# Altium PCB PCB1.PcbDoc (part 2 of 2)
Units mil, origin at the board's own origin, x right, y up, seen from the top; angles counter-clockwise.
Board outline 6000 x 4000 mil, 2 copper layers (Top Layer, Bottom Layer); 140 components, 124 nets, 525 pads, 86 vias.
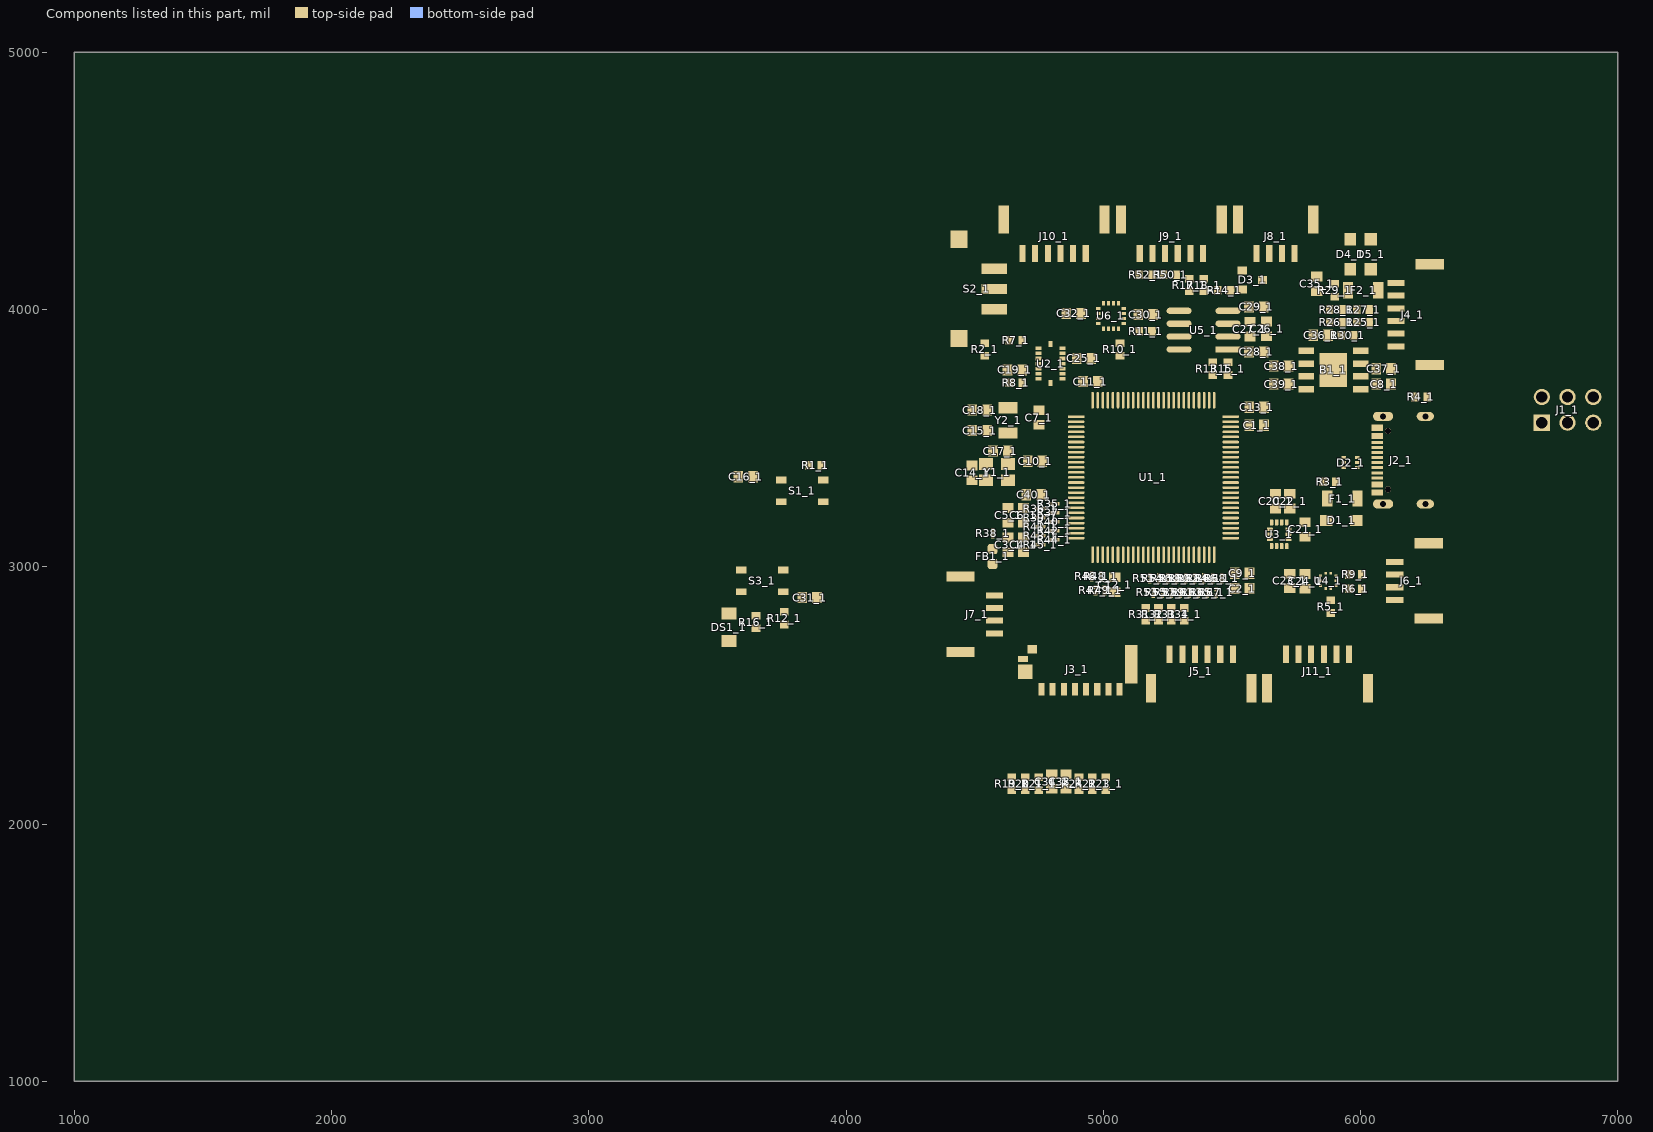
[diagram p2: the components of this part, seen from the top]

## Via types
v1: diameter 17.72, hole 11.81, Top Layer to Bottom Layer, 57 vias
v2: diameter 23.62, hole 11.81, Top Layer to Bottom Layer, 28 vias
v3: diameter 17.72/17.72 (per signal layer), hole 11.81, Top Layer to Bottom Layer, 1 vias

## Nets (pads, with @x,y where several pads share a name; then routed paths per layer and width w, separated by ;. In a path a pad name is that pad's centre, name@x,y a point inside that pad or via, vN(x,y) a via of type N, cw(c..) or ccw(c..) an arc to the next point about the centre after c; other vN are vias at no path point) (continued)
pads on no net: B1_1.1 B1_1.2 B1_1.3 B1_1.4 B1_1.5 B1_1.6 B1_1.7 B1_1.8 B1_1.9 C1_1.1 C1_1.2 C2_1.1 C2_1.2 C3_1.1 C3_1.2 C4_1.1 C4_1.2 C5_1.1 C5_1.2 C6_1.1 C6_1.2 C7_1.1 C7_1.2 C8_1.1 C8_1.2 C9_1.1 C9_1.2 C10_1.1 C10_1.2 C11_1.1 C11_1.2 C12_1.1 C12_1.2 C13_1.1 C13_1.2 C14_1.1 C14_1.2 C15_1.1 C15_1.2 C16_1.1 C16_1.2 C17_1.1 C17_1.2 C18_1.1 C18_1.2 C19_1.1 C19_1.2 C20_1.1 C20_1.2 C21_1.1 C21_1.2 C22_1.1 C22_1.2 C23_1.1 C23_1.2 C24_1.1 C24_1.2 C25_1.1 C25_1.2 C26_1.1 C26_1.2 C27_1.1 C27_1.2 C28_1.1 C28_1.2 C29_1.1 C29_1.2 C30_1.1 C30_1.2 C31_1.1 C31_1.2 C32_1.1 C32_1.2 C33_1.1 C33_1.2 C34_1.1 C34_1.2 C35_1.1 C35_1.2 C36_1.1 C36_1.2 C37_1.1 C37_1.2 C38_1.1 C38_1.2 C39_1.1 C39_1.2 C40_1.1 C40_1.2 D1_1.A D1_1.K D2_1.1 D2_1.2 D2_1.3 D2_1.4 D2_1.5 D2_1.6 D3_1.1 D3_1.2 D3_1.3 D4_1.A D4_1.K D5_1.1 D5_1.2 DS1_1.1 DS1_1.2 F1_1.1 F1_1.2 F2_1.1 F2_1.2 FB1_1.1 FB1_1.2 J1_1.1 J1_1.2 J1_1.3 J1_1.4 J1_1.5 J1_1.6 J2_1. J2_1.A1_B12 J2_1.A4_B9 J2_1.A5 J2_1.A6 J2_1.A7 J2_1.A8 J2_1.B1_A12 J2_1.B4_A9 J2_1.B5 J2_1.B6 J2_1.B7 J2_1.B8 J2_1.S1 J2_1.S2 J2_1.S3 J2_1.S4 J3_1.1 J3_1.2 J3_1.3 J3_1.4 J3_1.5 J3_1.6 J3_1.7 J3_1.8 J3_1.DET_1 J3_1.DET_2 J3_1.S1 J3_1.S2 J4_1.1 J4_1.2 J4_1.3 J4_1.4 J4_1.5 J4_1.6 J4_1.S1 J4_1.S2 J5_1.1 J5_1.2 J5_1.3 J5_1.4 J5_1.5 J5_1.6 J5_1.S1 J5_1.S2 J6_1.1 J6_1.2 J6_1.3 J6_1.4 J6_1.S1 J6_1.S2 J7_1.1 J7_1.2 J7_1.3 J7_1.4 J7_1.S1 J7_1.S2 J8_1.1 J8_1.2 J8_1.3 J8_1.4 J8_1.S1 J8_1.S2 J9_1.1 J9_1.2 J9_1.3 J9_1.4 J9_1.5 J9_1.6 J9_1.S1 J9_1.S2 J10_1.1 J10_1.2 J10_1.3 J10_1.4 J10_1.5 J10_1.6 J10_1.S1 J10_1.S2 J11_1.1 J11_1.2 J11_1.3 J11_1.4 J11_1.5 J11_1.6 J11_1.S1 J11_1.S2 R1_1.1 R1_1.2 R2_1.1 R2_1.2 R3_1.1 R3_1.2 R4_1.1 R4_1.2 R5_1.1 R5_1.2 R6_1.1 R6_1.2 R7_1.1 R7_1.2 R8_1.1 R8_1.2 R9_1.1 R9_1.2 R10_1.1 R10_1.2 R11_1.1 R11_1.2 R12_1.1 R12_1.2 R13_1.1 R13_1.2 R14_1.1 R14_1.2 R15_1.1 R15_1.2 R16_1.1 R16_1.2 R17_1.1 R17_1.2 R18_1.1 R18_1.2 R19_1.1 R19_1.2 R20_1.1 R20_1.2 R21_1.1 R21_1.2 R22_1.1 R22_1.2 R23_1.1 R23_1.2 R24_1.1 R24_1.2 R25_1.1 R25_1.2 R26_1.1 R26_1.2 R27_1.1 R27_1.2 R28_1.1 R28_1.2 R29_1.1 R29_1.2 R30_1.1 R30_1.2 R31_1.1 R31_1.2 R32_1.1 R32_1.2 R33_1.1 R33_1.2 R34_1.1 R34_1.2 R35_1.1 R35_1.2 R36_1.1 R36_1.2 R37_1.1 R37_1.2 R38_1.1 R38_1.2 R39_1.1 R39_1.2 R40_1.1 R40_1.2 R41_1.1 R41_1.2 R42_1.1 R42_1.2 R43_1.1 R43_1.2 R44_1.1 R44_1.2 R45_1.1 R45_1.2 R46_1.1 R46_1.2 R47_1.1 R47_1.2 R48_1.1 R48_1.2 R49_1.1 R49_1.2 R50_1.1 R50_1.2 R51_1.1 R51_1.2 R52_1.1 R52_1.2 R53_1.1 R53_1.2 R54_1.1 R54_1.2 R55_1.1 R55_1.2 R56_1.1 R56_1.2 R57_1.1 R57_1.2 R58_1.1 R58_1.2 R59_1.1 R59_1.2 R60_1.1 R60_1.2 R61_1.1 R61_1.2 R62_1.1 R62_1.2 R63_1.1 R63_1.2 R64_1.1 R64_1.2 R65_1.1 R65_1.2 R66_1.1 R66_1.2 R67_1.1 R67_1.2 R68_1.1 R68_1.2 S1_1.1 S1_1.2 S1_1.3 S1_1.4 S2_1.1 S2_1.2 S2_1.3 S2_1.M S3_1.1 S3_1.2 S3_1.3 S3_1.4 U1_1.1 U1_1.2 U1_1.3 U1_1.4 U1_1.5 U1_1.6 U1_1.7 U1_1.8 U1_1.9 U1_1.10 U1_1.11 U1_1.12 U1_1.13 U1_1.14 U1_1.15 U1_1.16 U1_1.17 U1_1.18 U1_1.19 U1_1.20 U1_1.21 U1_1.22 U1_1.23 U1_1.24 U1_1.25 U1_1.26 U1_1.27 U1_1.28 U1_1.29 U1_1.30 U1_1.31 U1_1.32 U1_1.33 U1_1.34 U1_1.35 U1_1.36 U1_1.37 U1_1.38 U1_1.39 U1_1.40 U1_1.41 U1_1.42 U1_1.43 U1_1.44 U1_1.45 U1_1.46 U1_1.47 U1_1.48 U1_1.49 U1_1.50 U1_1.51 U1_1.52 U1_1.53 U1_1.54 U1_1.55 U1_1.56 U1_1.57 U1_1.58 U1_1.59 U1_1.60 U1_1.61 U1_1.62 U1_1.63 U1_1.64 U1_1.65 U1_1.66 U1_1.67 U1_1.68 U1_1.69 U1_1.70 U1_1.71 U1_1.72 U1_1.73 U1_1.74 U1_1.75 U1_1.76 U1_1.77 U1_1.78 U1_1.79 U1_1.80 U1_1.81 U1_1.82 U1_1.83 U1_1.84 U1_1.85 U1_1.86 U1_1.87 U1_1.88 U1_1.89 U1_1.90 U1_1.91 U1_1.92 U1_1.93 U1_1.94 U1_1.95 U1_1.96 U1_1.97 U1_1.98 U1_1.99 U1_1.100 U2_1.1 U2_1.2 U2_1.3 U2_1.4 U2_1.5 U2_1.6 U2_1.7 U2_1.8 U2_1.9 U2_1.10 U2_1.11 U2_1.12 U2_1.13 U2_1.14 U2_1.15 U2_1.16 U3_1.1 U3_1.2 U3_1.3 U3_1.4 U3_1.5 U3_1.6 U3_1.7 U3_1.8 U3_1.9 U3_1.10 U3_1.11 U3_1.12 U3_1.13 U3_1.14 U4_1.1 U4_1.2 U4_1.3 U4_1.4 U4_1.5 U4_1.6 U4_1.7 U4_1.8 U4_1.9 U4_1.10 U5_1.1 U5_1.2 U5_1.3 U5_1.4 U5_1.5 U5_1.6 U5_1.7 U5_1.8 U6_1.1 U6_1.2 U6_1.3 U6_1.4 U6_1.5 U6_1.6 U6_1.7 U6_1.8 U6_1.9 U6_1.10 U6_1.11 U6_1.12 U6_1.13 U6_1.14 U6_1.15 U6_1.16 Y1_1.1 Y1_1.2 Y1_1.3 Y1_1.4 Y2_1.1 Y2_1.2
copper on no net: | length 50896
  Top Layer w5.91: v1(4595,3705) 4598.2,3705 4608.2,3715 4635.39,3715 ; v1(4595,3860) 4615,3880 4635.39,3880 ; 4684.61,3715 4713.5,3715 4723.27,3724.77 4723.27,3738.9 4733.04,3748.66 4747.17,3748.66 4749.13,3750.63 ; 4684.61,3880 4714.13,3880 4742.44,3851.69 4742.44,3851.02 4744.41,3849.06 4749.13,3849.06 ; v1(4715,3805) 4716.51,3803.49 4716.51,3797.9 4724.4,3790 4749.13,3790 ; v1(4720,3695) 4740.47,3715.47 4740.47,3727.01 4744.41,3730.94 4749.13,3730.94 ; 4743.19,3085 4745.16,3085 4749.09,3081.06 4749.09,3074.44 4754.28,3069.25 4833.62,3069.25 4853.56,3089.19 4853.56,3116.67 4861.66,3124.77 4861.91,3124.77 4867.77,3130.63 4895,3130.63 ; 4743.19,3120 4745.16,3120 4749.09,3116.06 4749.09,3109.44 4754.28,3104.25 4797.44,3104.25 4798.19,3105 ; 4743.19,3155 4745.16,3155 4749.09,3151.06 4749.09,3144.44 4754.28,3139.25 4797.44,3139.25 4798.19,3140 ; 4743.19,3190 4743.19,3178.46 4747.4,3174.25 4797.44,3174.25 4798.19,3175 ; 4743.19,3225 4745,3223.19 4745,3215 4750.75,3209.25 4798.19,3209.25 ; 4749.13,3809.68 4776.3,3809.68 4814.49,3847.87 4839.69,3847.87 4840.87,3849.06 4840.87,3875.87 v1(4870.03,3905.03) ; 4749.13,3829.37 4604.37,3829.37 4550,3775 4550,3720 4608.11,3661.89 4775.86,3661.89 4807.76,3630 4807.76,3569.63 4853.04,3524.35 4894.98,3524.35 ; 4766.81,3085 4806.46,3085 4815.91,3094.44 4815.91,3101.06 4819.84,3105 4821.81,3105 4831.97,3105 4841.75,3114.77 4841.75,3124.55 4861.66,3144.46 4861.91,3144.46 4867.77,3150.32 4895,3150.32 ; 4766.81,3120.75 4807.21,3120.75 4815.91,3129.44 4815.91,3136.06 4819.84,3140 4821.81,3140 4830,3140 4859.82,3169.82 4894.82,3169.82 4895,3170 ; 4766.81,3155 4767.56,3155.75 4810.75,3155.75 4815.91,3160.91 4815.91,3171.06 4819.84,3175 4821.81,3175 ; 4767.56,3225.75 4847.64,3225.75 4850.94,3229.06 ; 4769.17,3194.25 4834.25,3194.25 4849.69,3209.68 ; 4795,3865.39 4795,3885.87 4801.87,3892.74 4807.74,3892.74 v1(4810,3895) ; v1(4800,3494.68) 4801.51,3493.18 4814.55,3493.18 4842.45,3465.28 4895,3465.28 ; 4807.56,3547.56 4850.45,3504.66 4894.98,3504.66 ; 4821.81,3245.75 4834.25,3245.75 4850.94,3229.06 ; 4822.13,3209.68 4849.69,3209.68 ; 4830,3175 4831.7,3175 4846.39,3189.69 4895,3189.69 ; 4840.87,3770.32 4838.9,3768.35 4824.77,3768.35 4818.43,3762 4818.43,3698.54 4823.5,3693.46 4823.5,3576.15 4855.62,3544.03 4894.98,3544.03 ; v1(4865,3640) 4855,3630 4855,3589.2 4860.77,3583.43 4894.95,3583.43 4895,3583.39 ; v1(4880,3720) 4839.25,3679.25 4839.25,3582.68 4858.21,3563.72 4894.98,3563.72 ; 4895,3209.37 4894.69,3209.68 4849.69,3209.68 ; 4895,3229.06 4850.94,3229.06 ; 4913.7,3984.84 4979.8,3984.84 ; 4954.25,2951.38 4954.25,2907.47 4959.44,2902.28 4966.06,2902.28 4970,2898.35 4970,2896.38 ; 4955,2975 4955,2995 4959,2999 4959,3046.95 ; 4970,2920 4972.7,2922.7 4972.7,2982.3 4978.68,2988.29 ; 4978.68,3046.95 4978.68,2988.29 ; 4989.25,2951.38 4989.25,2907.47 4994.44,2902.28 5001.06,2902.28 5005,2898.35 5005,2896.38 5039.92,2896.38 5045,2901.46 ; 4990,2975 4990,2976.97 4978.68,2988.29 ; 4998.37,3046.95 4998.37,2994.91 5005.75,2987.53 5005.75,2920.75 5005,2920 ; 5018.05,3647.38 5018.05,3868.05 5039.41,3889.41 5039.41,3924.37 5039.84,3924.8 ; 5037.74,3647.38 5037.74,3844.31 5063.03,3869.61 5065,3869.61 ; 5057.42,3647.38 5057.42,3765.86 5100,3808.44 v1(5100,3890) ; 5059.53,3875.08 5059.53,3924.8 ; 5077.11,3647.38 5077.11,3752.11 v1(5105,3780) ; 5080.2,3945.47 5080.2,3909.8 5098.4,3891.6 v1(5100,3890) ; 5096.79,3647.38 5096.79,3743.49 5130,3776.7 v1(5130,3805) ; 5116.48,3647.38 5116.48,3701.36 5112.28,3705.55 5112.28,3742.28 v1(5150,3780) ; v1(5130,3722.72) 5130,3719.52 5136.16,3713.36 5136.16,3647.38 ; 5140.39,3915 5138.82,3913.43 5120.23,3913.43 5100,3893.2 v1(5100,3890) ; v1(5155,3705) 5155.42,3704.58 5155.42,3647.8 5155.85,3647.38 ; 5165,2839.61 5165,2865 5179.25,2879.25 ; v3(5174.97,3719.97) 5175.25,3719.69 5175.25,3647.7 5175.53,3647.42 ; 5180,2943.19 5179.25,2942.44 5179.25,2879.25 ; 5180,2966.81 5180,2984.44 5214.9,3019.34 5214.9,3046.95 ; 5191.06,2894.09 5195,2890.16 5195,2888.19 5195,2886.22 5191.06,2882.28 5182.28,2882.28 5179.25,2879.25 ; 5195,2911.81 5195.75,2912.56 5195.75,2980.5 5234.59,3019.34 5234.59,3046.95 ; 5214.25,2943.19 5214.25,2870.47 ; 5215,2839.61 5214.25,2840.35 5214.25,2870.47 ; 5215,2966.81 5215,2980.07 5254.27,3019.34 5254.27,3046.95 ; 5226.06,2894.09 5230,2890.16 5230,2888.19 5230,2886.22 5214.25,2870.47 ; 5230,2911.81 5230.75,2912.56 5230.75,2976.13 5272.64,3018.02 5272.64,3045.63 5273.96,3046.95 ; 5249.25,2943.19 5249.25,2899.28 5254.44,2894.09 5261.06,2894.09 5265,2890.16 5265,2888.19 5265,2839.61 ; 5250,2966.81 5267.79,2984.6 5267.79,2992.79 5293.64,3018.64 5293.64,3030 ; 5265,2911.81 5265.75,2912.56 5265.75,2952.21 5274.44,2960.91 5281.06,2960.91 5285,2964.84 ; 5284.25,2943.19 5284.25,2899.28 5289.44,2894.09 5296.06,2894.09 5300,2890.16 5300,2888.19 5300,2886.22 5315,2871.22 5315,2839.61 ; 5285,2966.81 5285,2984.46 5312.73,3012.19 5312.73,3024.4 5313.33,3025 5313.33,3046.95 ; 5295,3845 5291.44,3848.56 5246.44,3848.56 5225.73,3869.27 5225.73,4008.63 5287.48,4070.39 5335,4070.39 5390,4070.39 ; 5295,3895 5258.64,3895 5237.54,3916.11 5237.54,4003.74 5273.78,4039.98 5412.34,4039.98 5437.89,4065.53 5437.89,4082.5 ; 5295,3945 5366.57,3945 5494.61,4073.03 5494.61,4075 5538.03,4075 5543.82,4080.79 5543.82,4098.75 5585.66,4140.59 5660.59,4140.59 5694.61,4174.61 5694.61,4218.11 ; 5300,2911.81 5300.75,2912.56 5300.75,2952.21 5309.44,2960.91 5316.06,2960.91 5320,2964.84 5320,2966.81 5320,2993.98 5333.01,3006.99 5333.01,3025 ; 5313.33,3647.38 5313.33,3674.99 5383.73,3745.39 5425,3745.39 ; 5319.25,2943.19 5319.25,2899.28 5324.44,2894.09 5331.06,2894.09 5335,2890.16 5335,2888.19 5335,2866.41 5368.89,2832.52 5697.52,2832.52 v1(5738.7,2873.7) ; 5333.01,3647.38 5333.01,3674.99 5369.83,3711.81 5449.45,3711.81 5483.03,3745.39 5485,3745.39 ; 5335,2911.81 5335.75,2912.56 5335.75,2952.21 5344.44,2960.91 ; 5352.7,3046.95 5353.47,3046.18 5353.47,2968.34 5355,2966.81 5355,2964.84 5351.06,2960.91 ; 5353.47,2964.84 5353.47,2963.31 5351.06,2960.91 ; 5354.25,2943.19 5354.25,2899.28 5359.44,2894.09 5366.06,2894.09 5370,2890.16 5370,2866.51 5392.18,2844.33 5664.33,2844.33 v1(5680,2860) ; 5370,2911.81 5370.75,2912.56 5370.75,2952.21 5379.44,2960.91 5386.06,2960.91 5390,2964.84 5390,2966.81 5390,2990 5372.38,3007.62 5372.38,3025 ; 5389.25,2943.19 5389.25,2899.28 5394.44,2894.09 5401.06,2894.09 5405,2890.16 5405,2886.22 5426.22,2865 v1(5505,2865) ; 5392.07,3046.95 5392.74,3046.28 5392.74,3012.26 5423.93,2981.07 5423.93,2967.88 5425,2966.81 5425,2964.84 5421.06,2960.91 5414.44,2960.91 5405.75,2952.21 5405.75,2911.85 ; 5405,2911.81 5405.04,2911.85 ; 5411.75,3046.95 5411.75,3025 5411.92,3024.83 5411.92,3011.76 5428.68,2995 5448.3,2995 5460,2983.3 5460,2966.81 ; 5411.75,3647.38 5411.75,3674.99 5436.76,3700 v1(5465,3700) ; 5425,2943.19 5425,2925.09 5424.25,2924.34 5424.25,2899.28 5429.44,2894.09 5436.06,2894.09 5440,2890.16 5440,2888.19 5484.06,2888.19 5507.91,2912.05 5507.91,2915 ; 5425,3794.61 5425,3835 5435,3845 5485.05,3845 5556.46,3845 5566.46,3835 ; 5431.44,3046.95 5431.44,3018.56 5443.19,3006.81 5453.19,3006.81 5483.81,2976.19 5506.73,2976.19 ; 5440,2911.81 5440.75,2912.56 5440.75,2952.21 5449.44,2960.91 5456.06,2960.91 5460,2964.84 ; 5445.39,4075 5456.56,4086.17 5456.56,4096.05 5512.92,4152.4 5550.63,4152.4 5612.4,4152.4 5639.25,4179.25 5639.25,4211.96 5645.39,4218.11 ; 5460,2943.19 5462.5,2940.69 5460,2938.19 5460,2924.79 5470,2914.79 v2(5470,2910) ; 5485,3794.61 5485.39,3795 v1(5525,3795) ; 5485.05,3995 5485.05,4025.05 5495,4035 v1(5520,4035) 5541.46,4035 5547.76,4028.7 5550.71,4028.7 5566.46,4012.95 5566.46,4010 ; 5495.43,3110.94 5523.05,3110.94 5544.33,3089.66 5544.33,3081.44 5590.1,3035.67 5805.18,3035.67 5865.31,2975.53 5865.31,2975.04 ; 5495.43,3130.63 5536.87,3130.63 5549.49,3118.01 5549.49,3105.51 v1(5565,3090) ; 5495.43,3150.32 5538.75,3150.32 5608.48,3080.59 5654.45,3080.59 ; 5495.43,3170 5535.77,3170 5566.66,3139.11 5599,3106.77 5647.95,3106.77 ; 5495.43,3189.69 5546.08,3189.69 5570.77,3165 v1(5575,3165) ; 5495.43,3209.37 5550.84,3209.37 5560.21,3200 v1(5565,3200) ; 5495.43,3229.06 5570.01,3229.06 5585.67,3213.4 5585.67,3199.9 5599.33,3186.24 v1(5599.33,3185) ; 5495.43,3248.74 5571.26,3248.74 5620,3200 5620,3169.37 5643.23,3146.14 5647.95,3146.14 ; 5495.43,3268.43 5587.68,3268.43 v1(5588.18,3267.93) ; 5495.43,3288.11 5495.92,3288.6 5616.61,3288.6 5620.21,3285 v1(5625,3285) ; 5495.43,3307.8 5548.14,3307.8 5548.42,3307.52 5641.09,3307.52 5663.57,3330 v1(5665,3330) ; 5495.43,3327.48 5545.16,3327.48 5553.31,3319.33 5599.33,3319.33 v1(5620,3340) ; 5495.43,3347.17 5553.04,3347.17 5560.21,3340 v1(5565,3340) ; 5495.43,3366.85 5693.15,3366.85 v1(5710,3350) ; 5495.45,3386.52 5738.48,3386.52 v1(5760,3365) ; 5495.43,3406.22 5767.13,3406.22 v1(5810,3363.35) ; 5495.45,3484.94 5525.72,3484.94 5586.41,3424.25 5781.11,3424.25 5820.36,3385 5935,3385 ; 5495.45,3504.63 5528.3,3504.63 5529.3,3503.63 5592.93,3440 5790.22,3440 5805.85,3424.37 5935,3424.37 ; v1(5605,3130) 5606.77,3128.23 5646.18,3128.23 5647.95,3126.46 ; v1(5625,3235) 5625.5,3234.5 5625.5,3214.5 5645.31,3194.69 5680.78,3194.69 5690.19,3185.28 5690.19,3175.96 5693.82,3172.32 ; v1(5670,2805) 5722.47,2752.53 5752.47,2752.53 5806.14,2698.86 5806.14,2662.29 5808.43,2660 ; 5713.5,3080.59 5713.5,3078.9 5727.4,3065 5752.68,3065 5762.68,3075 v1(5765,3075) ; v1(5720,2805) 5735,2805 5848.78,2691.22 5848.78,2668.86 5857.64,2660 ; v1(5765,2805) 5810,2760 5850,2760 5906.85,2703.15 5906.85,2660 5905,2661.85 ; v1(5845,2875) 5879.09,2875 5879.09,2908.6 5885,2914.51 5885,2915 ; 5866.34,3195 5866.34,3275.39 5870.94,3280 5871.34,3279.61 ; 5879.61,2875 5885,2869.61 ; 5888.32,3325 5995.13,3325 6036.43,3366.3 6064.02,3366.3 6065,3365.32 ; 5905.18,2945.02 5927.5,2945.02 5955.53,2916.99 5955.53,2915.02 5955.53,2913.05 v1(5927.48,2885) ; 5905.67,2964.7 5950.22,2964.7 5955.53,2970.02 5955.53,2994.47 5941.21,3008.79 5926.21,3008.79 v1(5925,3010) ; 5935,3404.68 5935.98,3405.67 5946.37,3405.67 5968.46,3427.76 5968.46,3453.46 6017.13,3502.13 6058.11,3502.13 6065,3509.02 6071.89,3502.13 6112.87,3502.13 6140,3475 6140,3360 6106.93,3326.93 6071.89,3326.93 6065,3320.04 6060.51,3315.55 6027.8,3315.55 5989.06,3276.81 5989.06,3265 ; 5956.06,2660 5956.06,2746.06 6035,2825 6035,2914.23 6090.38,2969.61 6135.83,2969.61 ; 5988.15,3385 6040,3385 ; 5989.13,3423.39 5988.15,3424.37 6011.77,3424.37 6030.47,3443.07 6064.02,3443.07 6065,3444.06 6065.98,3443.07 6089.96,3443.07 6098.27,3434.76 6098.27,3412.56 6091.38,3405.67 6065.98,3405.67 6065,3404.69 ; 6065,3385 6040,3385 ; 6065,3424.37 6064.02,3423.39 6040.04,3423.39 6031.73,3415.08 6031.73,3393.27 6040,3385 ; 6065,3483.43 6065.98,3482.44 6089.96,3482.44 6107.4,3465 v1(6110,3465) ; v1(6070,2920) 6132.72,2920 6133.11,2920.39 ; v1(6165,3640) 6185,3660 6210.39,3660 ; 5344.44,2960.91 5351.06,2960.91 ; 5344.44,2960.91 5351.06,2960.91
  Top Layer w7.87: 5845.14,2945.02 5879.23,2945.02 5897.94,2926.32 5904.19,2926.32 5905.18,2925.33
  Top Layer w9.84: v2(4455,3569.21) v2@4460,3569.21 ; 4490,3336.46 4543.74,3336.46 4546.69,3333.5 4551.61,3333.5 4582.13,3302.99 4662.4,3302.99 4706.57,3347.17 4895,3347.17 ; 4490,3393.54 4543.74,3393.54 4546.69,3396.5 ; 4491.46,3529.21 4491.46,3532.17 4462.64,3560.99 4462.64,3566.58 v2@4460,3569.21 ; 4491.46,3609.21 4491.46,3606.26 4462.64,3577.44 4462.64,3571.85 v2@4460,3569.21 ; 4548.54,3529.21 4557.76,3520 4630,3520 4631.14,3518.86 4703.86,3518.86 4763.48,3459.25 4793.48,3459.25 4826.82,3425.91 4895,3425.91 ; 4548.54,3609.21 4620.79,3609.21 4627.5,3615.92 ; 4571.46,3450 4564.41,3442.95 4564.41,3414.21 4546.69,3396.5 ; v2(4574.33,3765) 4627.91,3765 ; 4615,3228.54 4617.95,3228.54 4631.73,3242.32 ; 4628.54,3401.26 4628.54,3450 ; 4630,3056.46 4632.95,3056.46 4646.73,3042.68 4646.73,3032 4660,3018.73 v2(4660,3015) 4673.27,3028.27 4673.27,3042.68 4687.05,3056.46 4690,3056.46 ; 4630,3113.54 4690,3113.54 ; 4630,3171.46 4690,3171.46 ; 4630,3618.43 4681.57,3618.43 4702.5,3597.5 4702.5,3542.5 4770,3475 4800,3475 4829.41,3445.59 4895,3445.59 ; 4633.31,3333.5 4628.39,3333.5 4583.11,3378.78 4564.41,3378.78 4546.69,3396.5 ; 4636.73,3242.32 4646.73,3242.32 4646.73,3256.73 v2(4660,3270) ; 4650,3395 4678.15,3366.85 4895,3366.85 ; 4685,3765 4690.38,3770.38 4749.07,3770.38 ; 4692.05,3228.54 4690,3228.54 4687.05,3228.54 4673.27,3242.32 4673.27,3253 4660,3266.27 v2(4660,3270) ; 4695,3113.54 4697.95,3113.54 4737.44,3153.03 4741.22,3153.03 4743.19,3155 ; 4695,3171.46 4697.95,3171.46 4716.5,3190 4743.19,3190 ; 4701.46,3280 4672.13,3280 4662.13,3270 v2(4660,3270) ; v2(4705,3635) 4721.4,3618.6 4739.94,3618.6 4750,3608.54 ; 4713,3265 4713.5,3265 4715.24,3263.27 4715.24,3262.76 4730,3248 4730,3236.46 4739.25,3227.2 4739.25,3226.97 4741.22,3225 4743.19,3225 ; 4714.41,3417.95 4706.46,3410 4692.68,3423.78 4692.68,3448.59 4685,3456.27 v2(4685,3460) 4729.59,3460 4746.09,3443.5 4786.95,3443.5 4824.24,3406.22 4895,3406.22 ; 4735,3050 4723.5,3061.5 4723.5,3102.28 4741.22,3120 4743.19,3120 ; 4749.13,3770.32 4749.33,3770.51 4775.51,3770.51 4814.49,3809.49 4840.67,3809.49 4840.87,3809.68 4896.46,3809.68 ; 4755,3551.46 4755,3520.77 4760.77,3515 4815,3515 4845.04,3484.96 4895,3484.96 ; 4758.54,3265 4758.54,3262.05 4772.32,3248.27 4792.95,3248.27 4796.22,3245 4798.19,3245 ; 4763.54,3410 4798.19,3410 4821.65,3386.54 4895,3386.54 ; v1(4795,3685) 4795,3714.61 ; v1(4800,3300) 4837.49,3300 4845.28,3307.8 4895,3307.8 ; v1(4830,3324.53) 4833.73,3324.53 4836.68,3327.48 4895,3327.48 ; v1(4835,3275) 4848.11,3288.11 4895,3288.11 ; 4840.87,3730.94 4840.87,3750.63 4874.22,3750.63 4901.11,3777.52 ; 4840.87,3790 4842.83,3788.03 4862.76,3788.03 4873.27,3777.52 4901.11,3777.52 ; 4840.87,3829.37 4842.83,3831.34 4862.13,3831.34 4873.27,3842.48 4877.48,3842.48 v2(4902.88,3867.88) 4902.88,3898.63 ; 4856.46,3985 4856.46,3946.44 4902.88,3900.01 4902.88,3898.63 ; 4896.46,3810 4896.46,3812.95 4943.5,3860 v2(4975,3860) 5000,3885 5000,3924.33 5000.47,3924.8 5001.46,3925.79 5001.46,3936.18 5030.44,3965.16 5080.2,3965.16 5122.68,3965.16 5136.46,3978.94 5136.46,3980 5136.46,3982.95 5114.88,4004.53 5080.2,4004.53 ; v2(4910,3665) 4910,3708.54 4921.46,3720 ; 4913.54,3985 4913.7,3984.84 ; 4920,3717.91 4926.69,3711.22 4926.69,3707.3 4959,3674.99 4959,3647.38 ; 4953.54,3812.95 4953.54,3810 ; 4970,2896.38 4971.97,2894.41 4971.97,2883.03 4988.55,2866.45 5003.55,2866.45 v2(5005,2865) ; 4970,3725 4978.68,3716.32 4978.68,3647.38 ; 4978.54,3720 v2(4978.54,3765) 4978.54,3768.73 4967.32,3779.95 4967.32,3796.22 4953.54,3810 ; 4979.8,4004.53 4990.47,4004.53 4999.49,3995.51 4999.49,3974.45 4991.18,3966.14 4980.79,3966.14 4979.8,3965.16 4978.82,3964.17 4968.43,3964.17 4902.88,3898.63 ; 5045,2901.46 5046.46,2900 v2(5105,2900) ; 5045,2958.54 5046.46,2960 v2(5105,2960) ; 5059.53,3875.08 5065,3869.61 ; 5167.36,2788.03 5165,2790.39 5166.97,2790.39 5222.81,2734.55 5254.47,2734.55 5307.36,2681.65 5307.36,2660 ; 5185.31,2528.11 5185.31,2685.32 v2@5205,2705 ; v2(5215,2710) 5217.64,2707.36 5237.64,2707.36 5251.26,2693.74 5251.26,2666.89 5258.15,2660 ; 5216.57,2788.82 5215,2790.39 5216.97,2790.39 5257.07,2750.3 5284.7,2750.3 5346.46,2688.54 5349.69,2688.54 5356.57,2681.65 5356.57,2660 ; 5265,2790.39 5266.97,2790.39 5337.36,2720 5367.44,2720 5405.79,2681.65 5405.79,2660 ; 5315,2790.39 5316.97,2790.39 5362.36,2745 5391.65,2745 5455,2681.65 5455,2660 ; 5335,4119.61 5335,4145 5343.49,4153.49 5381.51,4153.49 5390,4145 5390,4119.61 ; 5485.05,3895 5570,3895 5633.54,3895 5635,3896.46 5636.46,3895 5670,3895 v1(5680,3885) 5680,3860 5662.91,3842.91 ; 5485.05,3945 5570,3945 ; 5495.45,3544.03 5528.3,3544.03 5534.27,3550 5581.46,3550 ; 5495.45,3563.72 5525.72,3563.72 5538.84,3576.84 5538.84,3576.91 5545.41,3583.48 5591.44,3583.48 5625,3617.05 ; 5495.43,3583.39 5523.05,3583.39 5559.66,3620 5567.91,3620 5567.91,3652.91 v1(5580,3665) ; 5511.46,2975 5511.46,2977.95 5550.87,3017.36 5567.36,3017.36 v2(5570,3020) ; 5565,2915 5568.97,2918.97 5592.7,2918.97 5610,2936.27 v2(5610,2940) 5607.36,2942.64 5607.36,2966.1 5598.46,2975 5568.54,2975 5565,2975 ; 5570,3952.09 5633.54,3952.09 5635,3953.54 5674.33,3953.54 5677.87,3950 v1(5680,3950) ; 5577.05,2528.11 5577.05,2677.05 v2(5605,2705) 5637.17,2672.83 ; 5623.54,3835 5628.54,3840 5660,3840 5662.91,3842.91 ; 5623.54,4010 5672.87,4010 5677.87,4015 v1(5680,4015) ; 5625,3550 5625,3552.95 5654.41,3582.36 5673.82,3582.36 v2(5676.46,3585) 5673.82,3587.64 5654.41,3587.64 5625,3617.05 ; 5625,3620 5625,3617.05 ; 5637.17,2528.11 5637.17,2672.83 ; 5662.91,3710 5662.91,3780 5662.91,3842.91 ; 5667.95,3226.46 5670,3226.46 5672.95,3226.46 5705.77,3193.64 5713.5,3193.64 ; 5670,3283.54 5725,3283.54 5807.73,3283.54 5811.27,3280 v2(5815,3280) ; 5710,2660 5650,2660 5637.17,2672.83 ; 5713.5,3172.32 5713.5,3193.64 ; 5720,3106.77 5779.69,3106.77 ; 5720,3126.46 5721.36,3127.82 5736.32,3127.82 5778.2,3169.69 5783.17,3169.69 ; 5725,2916.46 5727.95,2916.46 5784.7,2859.7 ; 5727.95,2973.54 5766.77,3012.36 5782.36,3012.36 v2(5785,3015) 5787.64,3012.36 5796.99,3012.36 5844.65,2964.7 5845.14,2964.7 5845.14,2945.02 ; v2(5780,3230) 5728.54,3230 5725,3226.46 5713.5,3214.96 5713.5,3193.64 ; 5785,2972.09 v2@5785,3006.27 ; 5785,3116.46 5787.95,3116.46 5852.36,3052.05 5852.36,3047.64 v2(5855,3045) 5885,3015 5885,2975.04 ; 5785,3173.54 5827.17,3215.71 5827.17,3267.34 5815,3279.51 v2(5815,3280) ; 5789.17,3840 5777.87,3840 5770,3847.87 v1(5770,3880) 5771.51,3881.51 5771.51,3888.51 5782.99,3900 5816.46,3900 ; 5845.14,2925.33 5844.65,2925.33 5834.31,2915 ; 5855.39,3330 5845.55,3320.16 5845.55,3310.55 v2(5815,3280) ; 5865.31,2915 5834.31,2915 ; 5900,4050.39 5901.97,4050.39 5911.81,4040.55 5911.81,4019.76 5929.61,4001.97 5929.61,4000 ; v2@5962.44,3352.56 v2(5965,3350) 5965,3391.93 5976.78,3403.7 5987.17,3403.7 5988.15,3404.68 ; 6004.74,2915.02 6004.74,2869.74 v2(5975,2840) 5955.39,2820.39 5885,2820.39 5828.34,2820.39 5818.73,2830 v2(5815,2830) 5785,2860 5785,2915 5834.31,2915 ; 6004.74,2970.02 6004.74,3000.75 6016.88,3012.88 v2(6017.88,3012.88) ; 6028.9,2528.11 6028.9,2593.9 6060.23,2625.23 6094.77,2625.23 v2(6095,2625) ; 6065,3288.54 6065,3256.07 6076.82,3244.25 6087.83,3244.25 ; 6065,3540.51 6065,3572.98 6076.82,3584.8 6087.83,3584.8 ; 6252.01,3584.8 6252.01,3652.4 6259.61,3660 6259.61,3658.03 ; 4901.11,3777.52 4924.02,3777.52 4953.54,3807.05 4953.54,3810
  Top Layer w10: 1427.05,2486.85 ccw(c1623.9,2486.85) 1623.9,2290 2805,2290 ccw(c2805,2486.85) 3001.85,2486.85 3001.85,3667.95 ccw(c2805,3667.95) 2805,3864.8 1623.9,3864.8 ccw(c1623.9,3667.95) 1427.05,3667.95 1427.05,2486.85 ; 4371.5,2456.5 6340,2456.5 6340,4425 4371.5,4425 4371.5,2456.5
  Top Layer w11.81: 5789.17,3690 5750,3690 5735,3705 5735,3740 ; 5789.17,3740 5735,3740 ; 5789.17,3790 5750,3790 5735,3775 5735,3740 ; 6000.83,3740 6052.5,3740 6055,3737.5 ; 6000.83,3790 6040,3790 6055,3775 6055,3737.5 ; 6002.47,3691.64 6000.83,3690 6040,3690 6055,3705 6055,3737.5
  Bottom Layer w5.91: v1(4595,3860) v1(4595,3705) 4703.31,3596.69 4941.69,3596.69 5050,3705 v1(5155,3705) ; v1(4715,3805) 4725,3815 4740,3815 4865,3690 v1(4865,3640) ; v1(4720,3695) 4806.5,3608.5 4936.8,3608.5 5053.3,3725 v1@5121.8,3725 ; v1(4795,3685) 4826.68,3653.32 4826.68,3650.48 4856.85,3620.32 4931.91,3620.32 5057.34,3745.74 5149.2,3745.74 v3(5174.97,3719.97) ; v1(4810,3895) 4855,3895 4880,3870 v1(4880,3720) ; v1(4870.03,3905.03) 4894.97,3905.03 5040,3760 5160,3760 5220,3700 v1(5465,3700) 5535,3630 5535,3515 5685.67,3364.33 5685.67,3295.67 v1(5625,3235) ; v1@5121.83,3724.98 5127.74,3724.98 v1(5130,3722.72) ; v1(5505,2865) 5585.67,2784.33 5826.81,2784.33 v1(5927.48,2885) ; v1(5520,4035) 5550,4005 5550,3805 5542.26,3797.26 5527.26,3797.26 v1(5525,3795) ; v1(5565,3090) v1(5605,3130) ; v1(5565,3200) 5561.61,3196.61 5561.61,3180.84 5544.33,3163.56 5544.33,2859.08 5577.74,2825.67 5678.56,2825.67 5699.23,2805 v1(5720,2805) ; v1(5565,3340) 5564.33,3339.33 5564.33,3294.24 5532.52,3262.42 5532.52,2854.18 5581.7,2805 v1(5670,2805) ; v1(5575,3165) 5575.67,3164.33 5599.9,3164.33 5630,3134.23 5630,2974.23 5635.67,2968.56 5635.67,2951.44 5630.67,2946.44 5630.67,2869.33 5660.67,2839.33 5730.67,2839.33 v1(5765,2805) ; v1(5599.33,3185) 5655,3185 v1(5765,3075) ; v1(5680,2860) 5710,2860 5718.86,2851.14 5783.03,2851.14 5806.89,2875 v1(5845,2875) ; v1(5710,3350) 6070,2990 v1(6070,2920) ; v1(5738.7,2873.7) 5788.7,2873.7 v1(5925,3010) ; v1(6110,3465) 6130,3445 6159.23,3445 6165,3450.77 v1(6165,3640)
  Bottom Layer w9.84: 6087.83,3584.8 6092.73,3579.91 6122.73,3579.91
  other v1: 5040,3790 5855,3815 5363.49,4153.49

## Text inside footprints (layer, text, board x,y; h text height)
J1_1: Mechanical 2 "String" at 6966.65,3785.91 h60 r180
J2_1: Top 3D Body "PCB EDGE" at 6326.81,3619.25 h24 r90